# Altium PCB NB2DSK01.PcbDoc (part 7 of 17)
Units mil, origin at the board's own origin, x right, y up, seen from the top; angles counter-clockwise.
Board outline 11815 x 6500.03 mil, 8 copper layers (Top Layer, MidLayer1, MidLayer2, GND, PWR, MidLayer3, MidLayer4, Bottom Layer), stack 74.62 mil thick; 798 components, 1002 nets, 3927 pads, 3182 vias.
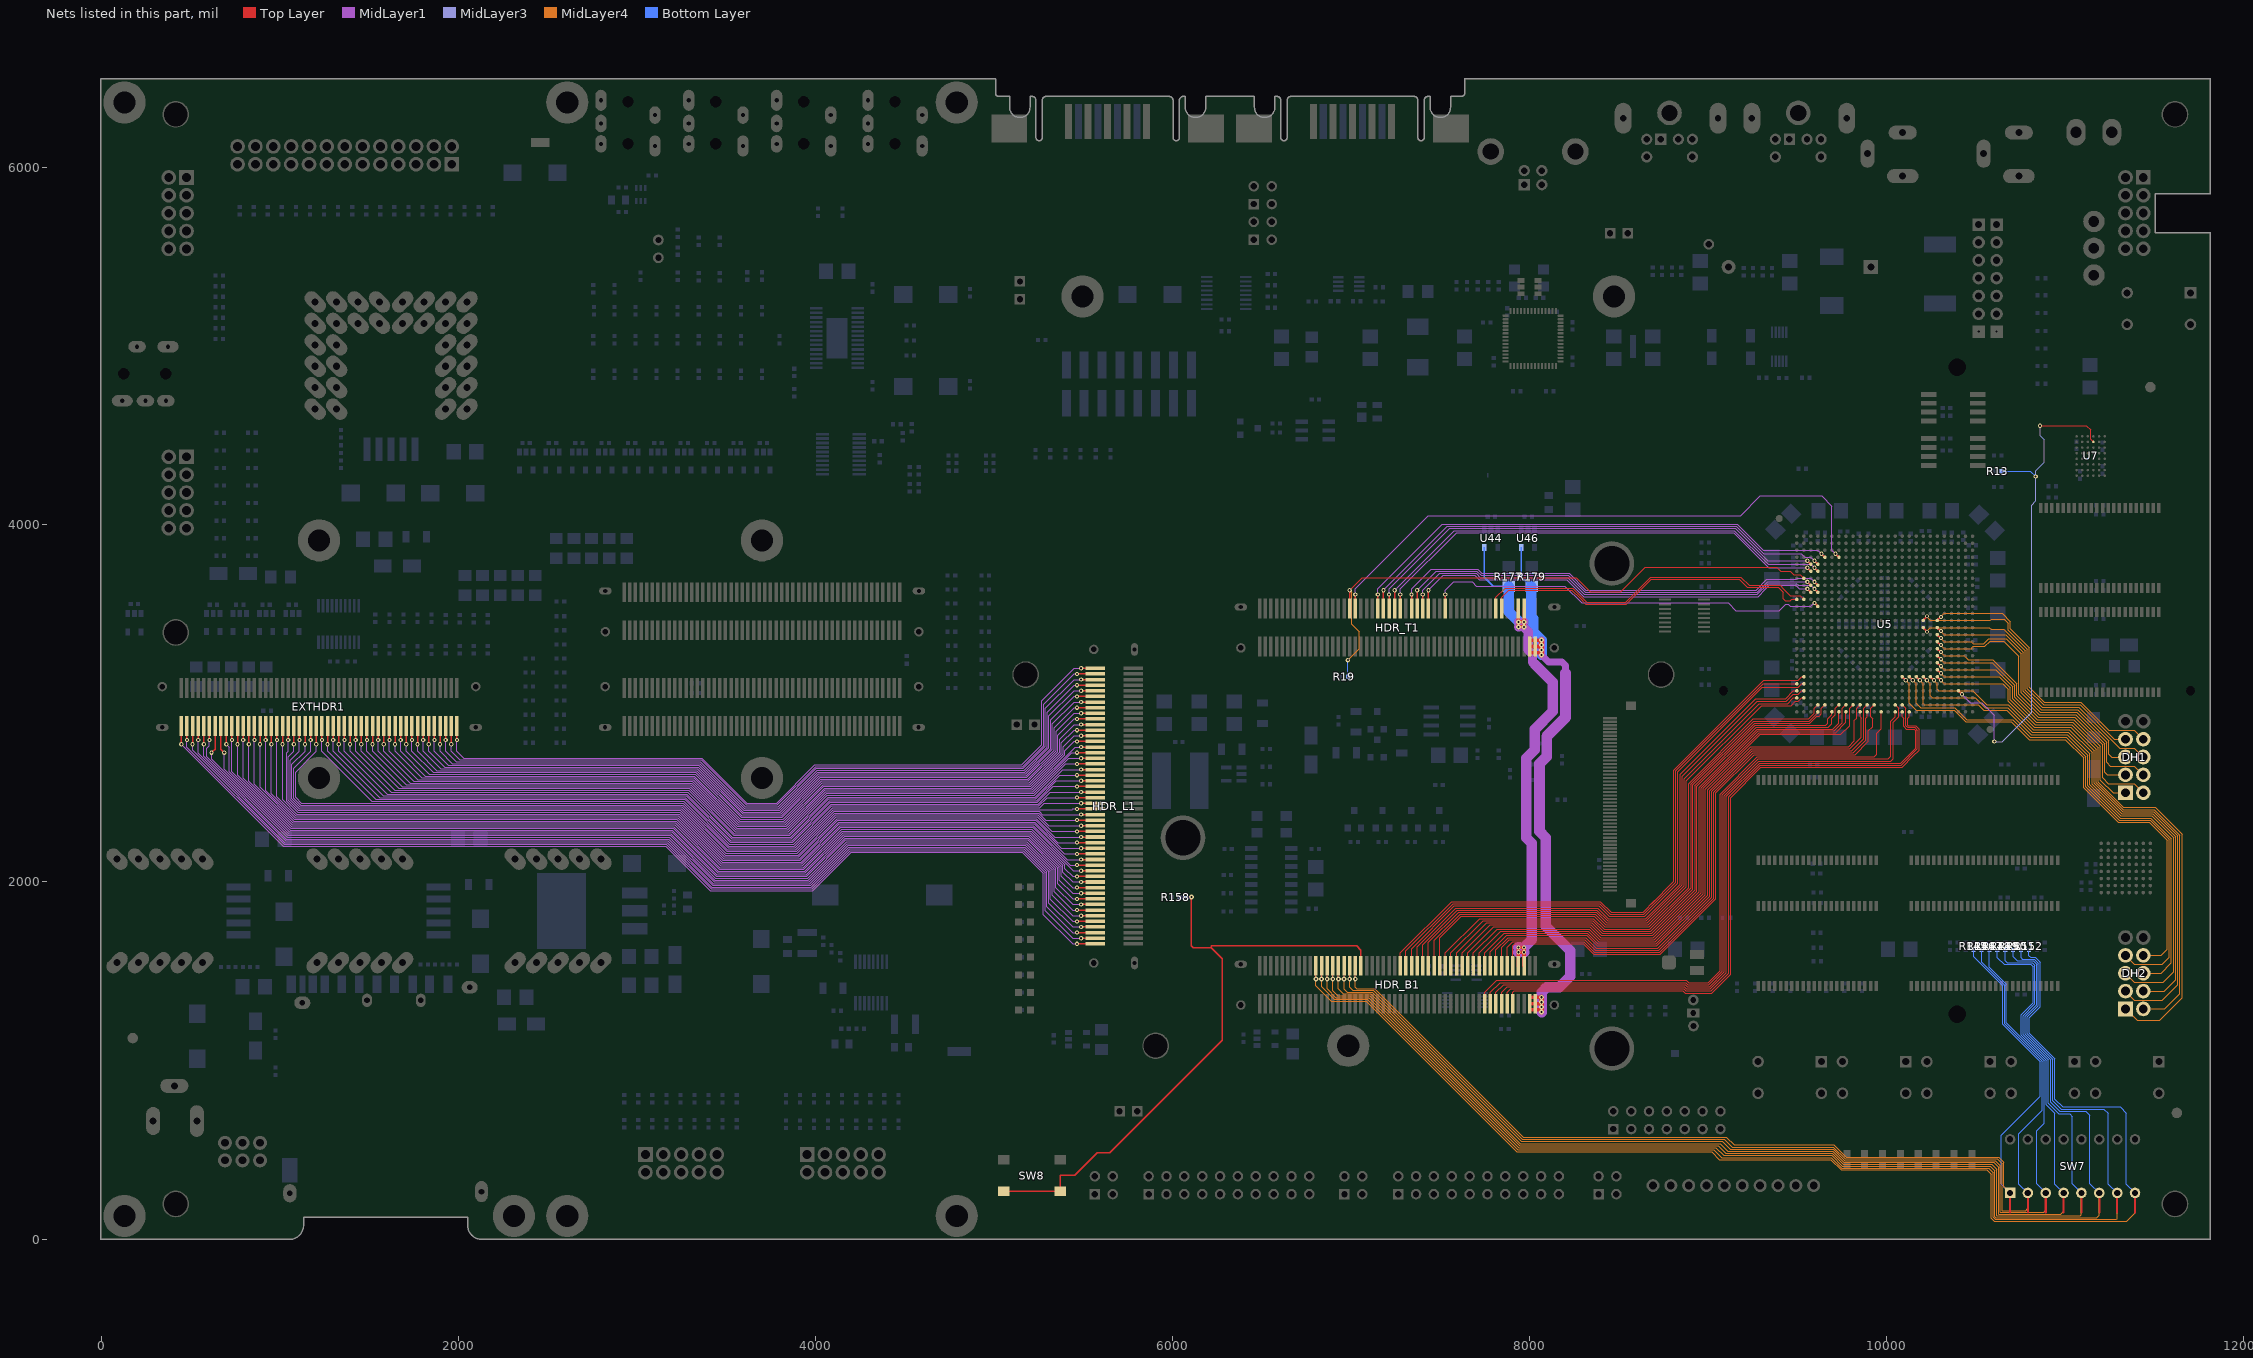
[diagram p13: the nets of this part, all layers, seen from the top]

## Via types
v1: diameter 23.62, hole 11.81, Top Layer to Bottom Layer, tented both sides, 1950 vias
v2: diameter 27.56, hole 11.81, Top Layer to Bottom Layer, tented both sides, 679 vias
v3: diameter 23.62, hole 11.81, Top Layer to Bottom Layer, 194 vias
v4: diameter 31.5, hole 11.81, Top Layer to Bottom Layer, tented both sides, 178 vias
v5: diameter 21.65, hole 11.81, Top Layer to Bottom Layer, tented both sides, 67 vias
v6: diameter 23.62, hole 11.81, Top Layer to Bottom Layer, tented bottom, 53 vias
v7: diameter 26, hole 11.81, Top Layer to Bottom Layer, tented both sides, 21 vias
v8: diameter 26, hole 11.81, Top Layer to Bottom Layer, 13 vias
v9: diameter 28, hole 11.81, Top Layer to Bottom Layer, 8 vias
v10: diameter 25.59, hole 11.81, Top Layer to Bottom Layer, tented both sides, 7 vias
v11: diameter 39.37, hole 11.81, Top Layer to Bottom Layer, tented both sides, 5 vias
v12: diameter 30, hole 11.81, Top Layer to Bottom Layer, 3 vias
v13: diameter 30, hole 11.81, Top Layer to Bottom Layer, tented both sides, 2 vias
v14: diameter 23, hole 11.81, Top Layer to Bottom Layer, tented both sides, 1 vias
v15: diameter 26.56, hole 11.81, Top Layer to Bottom Layer, tented both sides, 1 vias

## Nets (pads, with @x,y where several pads share a name; then routed paths per layer and width w, separated by ;. In a path a pad name is that pad's centre, name@x,y a point inside that pad or via, vN(x,y) a via of type N, cw(c..) or ccw(c..) an arc to the next point about the centre after c; other vN are vias at no path point) (continued)
DAU_PROG.ID3: HDR_T1.36 U5.D7 | length 3320.7
  Top Layer w7.87: HDR_T1.36@7023.62,3531.5 v1(7023.62,3610.24) ; v1(9712.6,3838.58) U5.D7@9732.28,3818.9
  MidLayer1 w5: v1(7023.62,3610.24) 7023.62,3641.73 7433.07,4051.18 9181.1,4051.18 9291.92,4162 9635.28,4162 9692.91,4104.37 9692.91,3858.27 v1(9712.6,3838.58)
DAU_PROG.INIT: HDR_T1.68 U5.L4 | length 2310.6
  Top Layer w7.87: HDR_T1.68@7527.56,3531.5 v1(7527.56,3610.24) ; v1(9594.49,3562.99) U5.L4@9614.17,3543.31
  MidLayer1 w5: v1(7527.56,3610.24) 7527.56,3633.86 7574.8,3681.1 7677.17,3681.1 7700.79,3657.48 8196.85,3657.48 8291.34,3562.99 9111.5,3562.99 9154.04,3520.45 9398.41,3520.45 9433.07,3555.12 9448.82,3555.12 9460.63,3543.31 9574.8,3543.31 v1(9594.49,3562.99)
DAU_PROG.INSTALLED: HDR_T1.34 R19.1 U5.G2 | length 3322.5
  Top Layer w5: v1(6992.13,3633.86) 7062.99,3704.73 8259.84,3704.73 8338.58,3625.99 8510.21,3625.99 8646.24,3762.01 9384.19,3762.01 9406.05,3740.16 9413.39,3740.16 9433.07,3740.16 9460.63,3740.16 9480.31,3720.47 9515.75,3720.47 U5.G2@9535.43,3700.79
  Top Layer w7.87: HDR_T1.34@6992.13,3531.5 v1(6992.13,3633.86)
  MidLayer4 w5: v1(6981.8,3242.47) 7046,3306.67 7046,3402.6 7004,3444.6 7004,3621.99 v1(6992.13,3633.86)
  Bottom Layer w5: R19.1@6981.8,3149.6 v1(6981.8,3242.47)
DAU_PROG.M0: HDR_T1.60 U5.J4 | length 2448.6
  Top Layer w7.87: HDR_T1.60@7401.58,3531.5 v1(7401.58,3610.24) ; v1(9594.49,3641.73) U5.J4@9614.17,3622.05
  MidLayer1 w5: v1(7401.58,3610.24) 7401.58,3633.86 7496.06,3728.35 7700.79,3728.35 7724.41,3704.73 8212.6,3704.73 8307.09,3610.24 9275.59,3610.24 9336.46,3671.1 9494.31,3671.1 9504,3661.42 9574.8,3661.42 v1(9594.49,3641.73)
DAU_PROG.M1: HDR_T1.58 U5.H3 | length 2432.7
  Top Layer w7.87: HDR_T1.58@7370.08,3531.5 v1(7370.08,3633.86) ; v1(9555.12,3681.1) U5.H3@9574.8,3661.42
  MidLayer1 w5: v1(7370.08,3633.86) 7476.38,3740.16 7704.72,3740.16 7728.35,3716.54 8216.54,3716.54 8311.02,3622.05 9273.26,3622.05 9332.31,3681.1 9413.39,3681.1 9433.07,3681.1 v1(9555.12,3681.1)
DAU_PROG.M2: HDR_T1.56 U5.H4 | length 2524.4
  Top Layer w7.87: HDR_T1.56@7338.58,3531.5 v1(7338.58,3610.24) ; v1(9594.49,3681.1) U5.H4@9614.17,3661.42
  MidLayer1 w5: v1(7338.58,3610.24) 7338.58,3641.73 7448.82,3751.97 7708.66,3751.97 7732.28,3728.35 8220.47,3728.35 8314.96,3633.86 9267.72,3633.86 9328.31,3694.45 9493.57,3694.45 9499.9,3700.79 9574.8,3700.79 v1(9594.49,3681.1)
DAU_PROG.PROG_CLK: HDR_T1.88 U5.K1 | length 1898.5
  Top Layer w5: HDR_T1.88@7842.52,3531.5 7842.52,3594.49 7881.89,3633.86 8236.22,3633.86 8279.53,3590.55 8314.96,3555.12 8541.35,3555.12 8681.39,3695.16 9174.92,3695.16 9219.29,3650.79 9393.63,3650.79 9421.21,3623.2 9421.21,3585.79 9432.2,3574.8 9460.63,3574.8 9468.5,3582.68 U5.K1@9496.06,3582.68
DAU_PROG.PROG_PWR_ON: HDR_T1.86 U5.K2 | length 1950.3
  Top Layer w5: HDR_T1.86@7811.02,3531.5 7811.02,3594.49 7862.21,3645.67 8240.16,3645.67 8318.9,3566.93 8538.16,3566.93 8677.68,3706.45 9183.31,3706.45 9228.98,3660.79 9402.2,3660.79 9419.54,3643.45 9460.63,3602.36 9515.75,3602.36 U5.K2@9535.43,3582.68
DAU_PROG.PROGRAM: HDR_T1.62 U5.J3 | length 2369.4
  Top Layer w7.87: HDR_T1.62@7433.07,3531.5 v1(7433.07,3633.86) ; v1(9555.12,3641.73) U5.J3@9574.8,3622.05
  MidLayer1 w5: v1(7433.07,3633.86) 7515.75,3716.54 7692.91,3716.54 7716.54,3692.91 8208.66,3692.91 8303.15,3598.43 9279.53,3598.43 9322.83,3641.73 9342.2,3661.1 9490.17,3661.1 9509.54,3641.73 v1(9555.12,3641.73)
DAU_RESET_SW: HDR_B1.38 R158.2 SW8.1 SW8.2 | length 3571.4
  Top Layer w7.87: SW8.2@5055.12,267.72 SW8.1@5370.47,267.72 5370.47,358.27 5452.76,358.27 5577.94,483.45 5648.68,483.45 6278.68,1113.45 6278.68,1570.02 6217.27,1631.43 ; v2(6105.79,1915) 6105.79,1642.21 6116.57,1631.43 6217.27,1631.43 ; HDR_B1.38@7055.12,1531.5 7055.12,1618.11 7031.5,1641.73 6217.27,1641.73 6217.27,1631.43
  Bottom Layer w15.75: R158.2@6038,1915 v2(6105.79,1915)
DAU_SPI.CLK: HDR_T1.46 U5.E4 | length 2771.9
  Top Layer w7.87: HDR_T1.46@7181.1,3531.5 v1(7181.1,3633.86) ; v1(9594.49,3799.21) U5.E4@9614.17,3779.53
  MidLayer1 w5: v1(7181.1,3633.86) 7539.37,3992.13 9156.64,3992.13 9280.31,3868.45 9310.18,3838.58 9413.39,3838.58 9433.07,3838.58 9519.69,3838.58 9539.37,3818.9 9574.8,3818.9 v1(9594.49,3799.21)
DAU_SPI.DIN: HDR_T1.50 U5.F4 | length 2705.6
  Top Layer w7.87: HDR_T1.50@7244.09,3531.5 v1(7244.1,3633.86) ; v1(9594.49,3759.84) U5.F4@9614.17,3740.16
  MidLayer1 w5: v1(7244.1,3633.86) 7578.74,3968.5 9146.86,3968.5 9335.83,3779.53 9413.39,3779.53 9433.07,3779.53 9574.8,3779.53 v1(9594.49,3759.84)
DAU_SPI.DOUT: HDR_T1.44 U5.D5 | length 2840.9
  Top Layer w7.87: HDR_T1.44@7149.61,3531.5 v1(7149.61,3610.24) ; v1(9633.86,3838.58) U5.D5@9653.54,3818.9
  MidLayer1 w5: v1(7149.61,3610.24) 7149.61,3641.73 7511.81,4003.94 9161.53,4003.94 9307.2,3858.27 9614.17,3858.27 v1(9633.86,3838.58)
DAU_SPI.MODE: HDR_T1.52 U5.F3 | length 2629.6
  Top Layer w7.87: HDR_T1.52@7275.59,3531.5 v1(7275.59,3610.24) ; v1(9555.12,3759.84) U5.F3@9574.8,3740.16
  MidLayer1 w5: v1(7275.59,3610.24) 7275.59,3641.73 7590.55,3956.69 9141.73,3956.69 9338.58,3759.84 9413.39,3759.84 9433.07,3759.84 v1(9555.12,3759.84)
DAU_SPI.SEL: HDR_T1.48 U5.E3 | length 2695.9
  Top Layer w7.87: HDR_T1.48@7212.6,3531.5 v1(7212.6,3610.24) ; v1(9555.12,3799.21) U5.E3@9574.8,3779.53
  MidLayer1 w5: v1(7212.6,3610.24) 7212.6,3641.73 7551.18,3980.32 9151.75,3980.32 9332.85,3799.21 9409.45,3799.21 9433.07,3799.21 v1(9555.12,3799.21)
DAU_TFT.BLIGHT: HDR_B1.91 U5.AF17 | length 3757.4
  Top Layer w5: HDR_B1.91@7905.51,1318.9 7905.51,1381.89 7913.39,1389.76 8858.27,1389.76 8870.08,1377.95 9019.69,1377.95 9125.98,1484.25 9125.98,2472.44 9295.28,2641.73 10085.73,2641.73 10149.68,2705.68 10181.68,2737.68 10181.68,2855.32 10161,2876 10121.13,2876 10118.11,2879.02 10118.11,2917.32 10125.98,2925.2 U5.AF17@10125.98,2952.76
DAU_TFT.BLUE0: HDR_B1.62 U5.AD1 | length 3161
  Top Layer w5: HDR_B1.62@7433.07,1531.5 7433.07,1661.42 7602.36,1830.71 8372.22,1830.71 8431.28,1771.65 8659.28,1771.65 8866.14,1978.52 8866.14,2578.91 9286.68,2999.45 9444.34,2999.45 9476.38,3031.5 U5.AD1@9496.06,3031.5
DAU_TFT.BLUE1: HDR_B1.64 U5.AD2 | length 3171
  Top Layer w5: HDR_B1.64@7464.57,1531.5 7464.57,1673.23 7610.24,1818.9 8367.33,1818.9 8426.38,1759.84 8664.17,1759.84 8877.95,1973.63 8877.95,2565.72 9300.68,2988.45 9464.83,2988.45 9488.19,3011.81 9503.94,3011.81 9523.62,3031.5 U5.AD2@9535.43,3031.5
DAU_TFT.BLUE2: HDR_B1.66 U5.AE4 | length 3220.5
  Top Layer w5: HDR_B1.66@7496.06,1531.5 7496.06,1687.06 7616.09,1807.09 8362.44,1807.09 8421.49,1748.03 8669.06,1748.03 8889.76,1968.74 8889.76,2551.18 9251.97,2913.39 9507.87,2913.39 9562.99,2913.39 9594.49,2944.88 9594.49,2972.44 U5.AE4@9614.17,2992.13
DAU_TFT.BLUE3: HDR_B1.68 U5.AF4 | length 3109.8
  Top Layer w5: HDR_B1.68@7527.56,1531.5 7527.56,1602.36 7720.47,1795.28 8357.54,1795.28 8416.6,1736.22 8673.95,1736.22 8901.58,1963.84 8901.57,2547.24 9255.91,2901.58 9566.93,2901.58 9570.87,2905.51 9614.17,2948.82 U5.AF4@9614.17,2952.76
DAU_TFT.BLUE4: HDR_B1.70 U5.AE5 | length 3150.7
  Top Layer w5: HDR_B1.70@7559.06,1531.5 7559.06,1602.36 7740.16,1783.47 8352.65,1783.47 8411.71,1724.41 8678.84,1724.41 8913.39,1958.95 8913.39,2543.31 9259.84,2889.76 9569.26,2889.76 9608.63,2929.13 9622.05,2929.13 9633.86,2940.95 9633.86,2972.44 U5.AE5@9653.54,2992.13
DAU_TFT.CL1: HDR_B1.88 U5.AE11 | length 3207.8
  Top Layer w5: HDR_B1.88@7842.52,1531.5 7842.52,1633.86 7885.83,1677.17 8308.62,1677.17 8367.68,1618.11 8722.88,1618.11 9019.69,1914.92 9019.69,2507.87 9215.38,2703.57 9247.26,2735.45 9802.68,2735.45 9870.08,2802.85 9870.08,2877.95 9870.08,2889.76 9870.08,2972.44 U5.AE11@9889.76,2992.13
DAU_TFT.CL2: HDR_B1.90 U5.AF11 | length 3149.2
  Top Layer w5: HDR_B1.90@7874.02,1531.5 7874.02,1633.86 7905.51,1665.36 8303.73,1665.36 8362.78,1606.3 8727.77,1606.3 9031.5,1910.03 9031.5,2503.94 9252.01,2724.45 9811.68,2724.45 9881.89,2794.66 9881.89,2877.95 9881.89,2889.76 9881.89,2917.32 9889.76,2925.2 U5.AF11@9889.76,2952.76
DAU_TFT.CL3: HDR_B1.92 U5.AE12 | length 3201.3
  Top Layer w5: HDR_B1.92@7905.51,1531.5 7905.51,1641.73 7917.32,1653.54 8298.84,1653.54 8357.89,1594.49 8732.66,1594.49 9043.31,1905.14 9043.31,2500 9256.76,2713.45 9822.68,2713.45 9897.64,2788.41 9897.64,2846.46 9921.26,2870.08 9921.26,2889.76 9921.26,2913.39 9909.45,2925.2 9909.45,2972.44 U5.AE12@9929.13,2992.13
DAU_TFT.DISP_ON: HDR_B1.89 U5.AE16 | length 3819.8
  Top Layer w5: HDR_B1.89@7874.02,1318.9 7874.02,1381.89 7893.7,1401.58 8862.2,1401.58 8874.02,1389.76 9015.75,1389.76 9114.17,1488.19 9114.17,2476.38 9291.34,2653.54 10079.72,2653.54 10171.68,2745.51 10171.68,2851.18 10156.86,2866 10116.14,2866 10106.3,2875.84 10106.3,2972.44 U5.AE16@10086.61,2992.13
DAU_TFT.GREEN0: HDR_B1.72 U5.AF6 | length 3147.4
  Top Layer w5: HDR_B1.72@7590.55,1531.5 7590.55,1602.36 7759.84,1771.65 8347.76,1771.65 8406.81,1712.6 8683.74,1712.6 8925.2,1954.06 8925.2,2539.37 9263.78,2877.95 9657.48,2877.95 9669.29,2889.76 9669.29,2913.39 9692.91,2937.01 U5.AF6@9692.91,2952.76
DAU_TFT.GREEN1: HDR_B1.74 U5.AE7 | length 3188.3
  Top Layer w5: HDR_B1.74@7622.05,1531.5 7622.05,1602.36 7779.53,1759.84 8342.87,1759.84 8401.92,1700.79 8688.63,1700.79 8937.01,1949.17 8937.01,2535.43 9267.72,2866.14 9673.23,2866.14 9692.91,2885.83 9692.91,2897.64 9692.91,2917.32 9712.6,2937.01 9712.6,2972.44 U5.AE7@9732.28,2992.13
DAU_TFT.GREEN2: HDR_B1.76 U5.AF7 | length 3138.8
  Top Layer w5: HDR_B1.76@7653.54,1531.5 7653.54,1602.36 7799.21,1748.03 8337.98,1748.03 8397.03,1688.98 8693.52,1688.98 8948.82,1944.28 8948.82,2531.5 9262.78,2845.45 9273.46,2856.14 9698.66,2856.14 9732.28,2889.76 U5.AF7@9732.28,2952.76
DAU_TFT.GREEN3: HDR_B1.78 U5.AE8 | length 3173.9
  Top Layer w5: HDR_B1.78@7685.04,1531.5 7685.04,1602.36 7818.9,1736.22 8333.08,1736.22 8392.14,1677.17 8698.41,1677.17 8960.63,1939.38 8960.63,2527.56 9279.21,2846.14 9706.37,2846.14 9751.97,2891.74 9751.97,2972.44 U5.AE8@9771.65,2992.13
DAU_TFT.GREEN4: HDR_B1.80 U5.AF8 | length 3113.5
  Top Layer w5: HDR_B1.80@7716.54,1531.5 7716.53,1602.36 7838.58,1724.41 8328.19,1724.41 8387.25,1665.36 8703.31,1665.36 8972.44,1934.49 8972.44,2523.62 9268.27,2819.45 9284.96,2836.14 9713.37,2836.14 9771.65,2894.43 U5.AF8@9771.65,2952.76
DAU_TFT.GREEN5: HDR_B1.82 U5.AE9 | length 3161.8
  Top Layer w5: HDR_B1.82@7748.03,1531.5 7748.03,1602.36 7858.27,1712.6 8323.3,1712.6 8382.35,1653.54 8708.2,1653.54 8984.25,1929.6 8984.25,2519.69 9290.71,2826.14 9743.46,2826.14 9791.34,2874.02 9791.34,2889.76 9791.34,2972.44 U5.AE9@9811.02,2992.13
DAU_TFT.IRQ: HDR_B1.81 U5.AF13 | length 3647.3
  Top Layer w5: HDR_B1.81@7748.03,1318.9 7748.03,1381.89 7814.96,1448.82 8877.95,1448.82 8889.76,1437.01 9000,1437.01 9066.93,1503.94 9066.93,2492.13 9275.59,2700.79 9929.13,2700.79 9944.88,2716.54 9944.88,2834.22 9968.5,2857.84 9968.5,2870.08 9968.5,2889.76 U5.AF13@9968.5,2952.76
DAU_TFT.M: HDR_B1.87 U5.AF16 | length 3796.5
  Top Layer w5: HDR_B1.87@7842.52,1318.9 7842.52,1381.89 7874.02,1413.39 8866.14,1413.39 8877.95,1401.58 9011.81,1401.58 9102.36,1492.13 9102.36,2480.32 9287.4,2665.36 10077.39,2665.36 10161.68,2749.65 10161.68,2847.03 10152.72,2856 10110.13,2856 10094.49,2871.65 10094.49,2917.32 10086.61,2925.2 U5.AF16@10086.61,2952.76
DAU_TFT.MUX: HDR_B1.85 U5.AE15 | length 3741.8
  Top Layer w5: HDR_B1.85@7811.02,1318.9 7811.02,1381.89 7854.33,1425.2 8870.08,1425.2 8881.89,1413.39 9007.87,1413.39 9090.55,1496.06 9090.55,2484.25 9283.46,2677.17 10023.62,2677.17 10035.55,2689.09 10035.55,2893.82 10066.93,2925.2 10066.93,2972.44 U5.AE15@10047.24,2992.13
DAU_TFT.POL: HDR_B1.83 U5.AF15 | length 3701.5
  Top Layer w5: HDR_B1.83@7779.53,1318.9 7779.53,1381.89 7834.65,1437.01 8874.02,1437.01 8885.83,1425.2 9003.94,1425.2 9078.74,1500 9078.74,2488.19 9279.53,2688.98 10007.87,2688.98 10023.68,2704.78 10023.68,2901.64 10047.24,2925.2 U5.AF15@10047.24,2952.76
DAU_TFT.RED0: HDR_B1.52 U5.AA2 | length 3410.4
  Top Layer w5: HDR_B1.52@7275.59,1531.5 7275.59,1602.36 7562.99,1889.76 8396.68,1889.76 8455.74,1830.71 8634.81,1830.71 8701.27,1897.16 ; 8683.62,1879.51 8807.09,2002.98 8807.09,2625.98 9311.02,3129.92 9413.39,3129.92 9433.07,3129.92 9503.94,3129.92 9523.62,3149.61 U5.AA2@9535.43,3149.61
DAU_TFT.RED1: HDR_B1.54 U5.AB1 | length 3305.8
  Top Layer w5: HDR_B1.54@7307.09,1531.5 7307.09,1614.17 7570.87,1877.95 8391.79,1877.95 8450.85,1818.9 8639.71,1818.9 8818.9,1998.09 8818.9,2622.05 9307.09,3110.24 9413.39,3110.24 9433.07,3110.24 U5.AB1@9496.06,3110.24
DAU_TFT.RED2: HDR_B1.56 U5.AB2 | length 3346.1
  Top Layer w5: HDR_B1.56@7338.58,1531.5 7338.58,1625.98 7578.74,1866.14 8386.9,1866.14 8445.95,1807.09 8644.6,1807.09 8717.97,1880.46 ; 8700.32,1862.81 8830.71,1993.2 8830.71,2618.11 9303.15,3090.55 9413.39,3090.55 9433.07,3090.55 9503.94,3090.55 9523.62,3110.24 U5.AB2@9535.43,3110.24
DAU_TFT.RED3: HDR_B1.58 U5.AC1 | length 3235.6
  Top Layer w5: HDR_B1.58@7370.08,1531.5 7370.08,1637.8 7586.61,1854.33 8382.01,1854.33 8441.06,1795.28 8649.49,1795.28 8842.52,1988.31 8842.52,2604.29 9265.79,3027.56 9413.39,3027.56 9433.07,3027.56 9476.38,3070.87 U5.AC1@9496.06,3070.87
DAU_TFT.RED4: HDR_B1.60 U5.AC2 | length 3246.2
  Top Layer w5: HDR_B1.60@7401.58,1531.5 7401.57,1649.61 7594.49,1842.52 8377.11,1842.52 8436.17,1783.47 8654.38,1783.47 8854.33,1983.41 8854.33,2592.1 9273.68,3011.45 9436.65,3011.45 9476.38,3051.18 9503.94,3051.18 9523.62,3070.87 U5.AC2@9535.43,3070.87
DAU_TFT.STH: HDR_B1.86 U5.AF10 | length 3169
  Top Layer w5: HDR_B1.86@7811.02,1531.5 7811.02,1619.72 7880.28,1688.98 8313.51,1688.98 8372.57,1629.92 8717.98,1629.92 9007.87,1919.81 9007.87,2511.81 9242.52,2746.45 9792.68,2746.45 9858.27,2812.04 9858.27,2877.95 9858.27,2889.76 9858.27,2917.32 9850.39,2925.2 U5.AF10@9850.39,2952.76
DAU_TFT.STV: HDR_B1.84 U5.AE10 | length 3215.6
  Top Layer w5: HDR_B1.84@7779.53,1531.5 7779.53,1608.3 7872.02,1700.79 8318.41,1700.79 8377.46,1641.73 8713.09,1641.73 8996.06,1924.71 8996.06,2515.75 9238.77,2758.45 9786.68,2758.45 9818.9,2790.67 9818.9,2877.95 9818.9,2889.76 9818.9,2905.51 9830.71,2917.32 9830.71,2972.44 U5.AE10@9850.39,2992.13
DBPOWER.3V3: HDR_B1.94 HDR_B1.96 HDR_T1.94 HDR_T1.96 R177.2 U44.5 | length 3225.7
  Top Layer w19.68: HDR_B1.94@7937.01,1531.5 v1(7937.01,1606.3) v1(7937.01,1633.86) ; v2(7968.5,3429.13) v2(7968.5,3456.69) HDR_T1.96@7968.5,3531.5
  Top Layer w20: v1(7937.01,1606.3) v1(7968.5,1606.3) ; v1(7937.01,1633.86) v1(7968.5,1633.86) v1(7968.5,1606.3) ; HDR_T1.94@7937.01,3531.5 v2(7937.01,3456.69) ; HDR_B1.96@7968.5,1531.5 v1(7968.5,1606.3) ; v2(7968.5,3429.13) v2(7937.01,3429.13) v2(7937.01,3456.69) ; v2(7968.5,3456.69) v2(7937.01,3456.69)
  MidLayer1 w51.18: v2(7937.01,3429.13) 7940.95,3429.13 7952.76,3440.94 ; v2(7937.01,3456.69) 7950.79,3442.91 7952.76,3440.94 ; v2(7968.5,3456.69) 7954.73,3442.91 7952.76,3440.94 ; 8031.5,3216.54 8015.75,3232.28 8015.75,3275.59 7992.13,3299.21 7992.13,3401.58 7966.54,3427.17 7952.76,3440.94
  MidLayer1 w59.06: v1(7937.01,1606.3) 7940.94,1606.3 7952.76,1618.11 7954.72,1620.08 ; v1(7937.01,1633.86) 7940.94,1633.86 7952.76,1622.05 7954.72,1620.08 ; v1(7968.5,1606.3) 7954.72,1620.08 ; 8031.5,3216.54 8129.92,3118.11 8129.92,2956.69 8027.56,2854.33 8027.56,2740.16 7980.32,2692.91 7980.32,2248.03 8011.81,2216.54 8011.81,1677.17 v1(7968.5,1633.86) 7954.72,1620.08
  Bottom Layer w7.87: U44.5@7746.06,3874.38 7746.06,3706.69 7797.24,3655.51 R177.2@7883.86,3655.51
  Bottom Layer w59.06: R177.2@7883.86,3655.51 7883.86,3513.78 7938.98,3458.66 7952.76,3444.88
DBPOWER.5V0: HDR_B1.97 HDR_B1.99 HDR_T1.97 HDR_T1.99 R179.2 U46.5 | length 3643.3
  Top Layer w19.68: HDR_B1.97@8000,1283.46 8031.5,1283.46 v2@8066.93,1283.46 ; HDR_B1.97@8000,1318.9 HDR_B1.99@8031.5,1318.9 v2@8066.93,1318.9 ; HDR_T1.97@8000,3283.46 8031.5,3283.46 v2@8066.93,3283.46 ; HDR_T1.97@8000,3318.9 HDR_T1.99@8031.5,3318.9 v2@8066.93,3318.9
  Top Layer w20: HDR_B1.97@8000,1354.33 8031.5,1354.33 v2(8066.93,1354.33) ; HDR_T1.97@8000,3354.33 8031.5,3354.33 v2(8066.93,3354.33)
  Top Layer w29.53: v2(8066.93,1271.65) 8066.93,1283.46 v2(8066.93,1299.21) 8066.93,1318.9 v2(8066.93,1326.77) v2(8066.93,1354.33) ; v2(8066.93,3271.65) 8066.93,3283.46 v2(8066.93,3299.21) 8066.93,3318.9 v2(8066.93,3326.77) v2(8066.93,3354.33)
  MidLayer1 w39.37: v2(8066.93,3354.33) v2(8066.93,3326.77) v2(8066.93,3299.21) v2(8066.93,3271.65) 8106.3,3232.28 8181.1,3232.28 8200.79,3212.6 8200.79,3169.29
  MidLayer1 w59.06: v2(8066.93,1271.65) v2(8066.93,1299.21) v2(8066.93,1326.77) v2(8066.93,1354.33) 8066.93,1381.89 8094.49,1409.45 8165.35,1409.45 8228.35,1472.44 8228.35,1614.17 8090.55,1751.97 8090.55,2248.03 8055.12,2283.46 8055.12,2661.42 8094.49,2700.79 8094.49,2814.96 8200.79,2921.26 8200.79,3169.29
  Bottom Layer w7.87: U46.5@7952.76,3874.38 7952.76,3708.66 R179.2@8007.87,3653.54
  Bottom Layer w59.06: R179.2@8007.87,3657.48 8007.87,3655.51 8007.87,3653.54 8007.87,3485.98 8019.68,3474.17 8019.68,3401.57 v2(8066.93,3354.33) v2(8066.93,3326.77) v2(8066.93,3299.21) v2(8066.93,3271.65)
DEBA.D0: DH1.1 U5.V21 | length 1521.4
  Top Layer w7.87: U5.V21@10283.46,3267.72 v1(10303.15,3248.03)
  MidLayer4 w5: v1(10303.15,3248.03) 10322.84,3228.35 10543.31,3228.35 10562.99,3228.35 10590.55,3228.35 10716.54,3102.36 10716.54,3035.43 10842.52,2909.45 11047.24,2909.45 11196.85,2759.84 11196.85,2570.87 11267.72,2500 DH1.1@11337.01,2500
DEBA.D1: DH1.2 U5.U21 | length 1635.4
  Top Layer w7.87: U5.U21@10283.46,3307.09 v1(10303.15,3287.4)
  MidLayer4 w5: v1(10303.15,3287.4) 10322.84,3267.72 10433.07,3267.72 10456.69,3244.1 10543.31,3244.1 10562.99,3244.1 10594.49,3244.1 10728.35,3110.24 10728.35,3043.31 10848.29,2923.37 11053.01,2923.37 11208.66,2767.72 11208.66,2582.68 11240.16,2551.18 11385.83,2551.18 DH1.2@11437.01,2500
DEBA.D2: DH1.3 U5.T21 | length 1617.5
  Top Layer w7.87: U5.T21@10283.46,3346.46 v1(10303.15,3326.77)
  MidLayer4 w5: v1(10303.15,3326.77) 10322.84,3307.09 10472.44,3307.09 10484.25,3318.9 10550.13,3318.9 10580.68,3349.45 10655.68,3349.45 10739.76,3265.37 10739.76,3235.53 ; 10740.16,3235.53 10740.16,3051.18 10854.05,2937.29 11058.78,2937.29 11220.47,2775.59 11220.47,2614.17 11234.65,2600 DH1.3@11337.01,2600
DEBA.D3: DH1.4 U5.R21 | length 1698.1
  Top Layer w7.87: U5.R21@10283.46,3385.83 v1(10303.15,3366.14)
  MidLayer4 w5: v1(10303.15,3366.14) 10322.84,3346.46 10472.44,3346.46 10484.25,3334.65 10543.31,3334.65 10571.12,3362.45 10669.04,3362.45 10751.97,3279.53 10751.97,3059.06 10859.82,2951.21 11064.54,2951.21 11232.28,2783.47 11232.28,2669.29 11251.97,2649.61 11387.4,2649.61 DH1.4@11437.01,2600
DEBA.D4: DH1.5 U5.P21 | length 1526.9
  Top Layer w7.87: U5.P21@10283.46,3425.2 v1(10303.15,3405.51)
  MidLayer4 w5: v1(10303.15,3405.51) 10322.84,3385.83 10543.31,3385.83 10562.99,3385.83 10665.35,3385.83 10763.78,3287.4 10763.78,3066.93 10865.58,2965.13 11070.31,2965.13 11244.09,2791.34 11244.09,2716.54 11260.63,2700 DH1.5@11337.01,2700
DEBA.D5: DH1.6 U5.P19 | length 1678.1
  Top Layer w7.87: U5.P19@10204.72,3425.2 v5@10224.41,3405.51
  MidLayer4 w5: v5@10224.41,3405.51 10244.09,3425.2 10543.31,3425.2 10562.99,3425.2 10574.8,3425.2 10584.55,3415.45 10655.41,3415.45 10775.59,3295.28 10775.59,3074.8 10871.35,2979.05 11076.07,2979.05 11305.12,2750 11387.01,2750 DH1.6@11437.01,2700
  other v5: 10224.41,3401.58
DEBA.D6: DH1.7 U5.N19 | length 1582.6
  Top Layer w7.87: U5.N19@10204.72,3464.57 v5@10224.41,3484.25
  MidLayer4 w5: v5@10224.41,3484.25 10244.09,3464.57 10543.31,3464.57 10562.99,3464.57 10578.74,3464.57 10586.61,3472.44 10657.48,3472.44 10681.1,3448.82 10681.1,3409.45 10787.4,3303.15 10787.4,3082.68 10877.95,2992.13 11082.68,2992.13 11274.8,2800 DH1.7@11337.01,2800
  other v5: 10224.41,3488.19
DEBA.D7: DH1.8 U5.N21 | length 1613.6
  Top Layer w7.87: U5.N21@10283.46,3464.57 v1(10303.15,3484.25)
  MidLayer4 w5: v1(10303.15,3484.25) 10322.84,3503.94 10543.31,3503.94 10562.99,3503.94 10645.67,3503.94 10692.91,3456.69 10692.91,3417.32 10799.21,3311.02 10799.21,3090.55 10881.89,3007.87 11086.61,3007.87 11244.09,2850.39 11386.62,2850.39 DH1.8@11437.01,2800
DEBB.D0: DH2.1 U5.W21 | length 3233.7
  Top Layer w7.87: U5.W21@10283.46,3228.35 v1(10303.15,3208.66)
  MidLayer4 w5: v1(10303.15,3208.66) 10322.84,3188.98 10543.31,3188.98 10562.98,3188.98 10610.25,3188.97 10704.72,3094.49 10704.72,3027.56 10837.74,2894.54 11042.47,2894.54 11185.04,2751.97 11185.04,2557.87 11325.59,2417.32 11503.94,2417.32 11653.54,2267.72 11653.54,1350.39 11527.56,1224.41 11401.58,1224.41 DH2.1@11337.01,1288.98
DEBB.D1: DH2.2 U5.Y21 | length 3020.3
  Top Layer w7.87: U5.Y21@10283.46,3188.98 v1(10303.15,3169.29)
  MidLayer4 w5: v1(10303.15,3169.29) 10322.84,3149.61 10543.31,3149.61 10562.99,3149.61 10629.92,3149.61 10692.92,3086.61 10692.92,3019.68 10831.98,2880.62 11036.7,2880.62 11173.23,2744.1 11173.23,2555.54 11323.26,2405.51 11499.04,2405.51 11641.73,2262.83 11641.73,1374.02 11556.69,1288.98 DH2.2@11437.01,1288.98
DEBB.D2: DH2.3 U5.AA21 | length 3044.6
  Top Layer w7.87: U5.AA21@10283.46,3149.61 v1(10303.15,3129.92)
  MidLayer4 w5: v1(10303.15,3129.92) 10322.84,3110.23 10543.31,3110.24 10562.99,3110.24 10649.61,3110.24 10681.1,3078.74 10681.1,3011.81 10826.21,2866.7 11030.94,2866.7 11161.42,2736.22 11161.42,2553.21 11320.92,2393.7 11494.15,2393.7 11629.92,2257.93 11629.92,1425.2 11543.31,1338.58 11387.4,1338.58 DH2.3@11337.01,1388.98
DEBB.D3: DH2.4 U5.AA20 | length 2875.9
  Top Layer w7.87: U5.AA20@10244.09,3149.61 v1(10263.78,3129.92)
  MidLayer4 w5: v1(10263.78,3129.92) 10283.47,3110.23 10283.47,3078.74 10291.34,3070.87 10480.32,3070.87 10559.06,2992.13 10562.99,2992.13 10578.74,2992.13 10681.1,2992.13 10820.45,2852.78 11023.14,2852.78 11149.61,2726.32 11149.61,2548.32 11316.03,2381.89 11489.26,2381.89 11618.11,2253.04 11618.11,1452.76 11554.33,1388.98 DH2.4@11437.01,1388.98
DEBB.D4: DH2.5 U5.AA19 | length 2981.8
  Top Layer w7.87: U5.AA19@10204.72,3149.61 v1(10224.41,3129.92)
  MidLayer4 w5: v1(10224.41,3129.92) 10244.1,3110.23 10244.1,3043.31 10255.91,3031.5 10496.06,3031.5 10551.18,2976.38 10562.99,2976.38 10578.74,2976.38 10677.17,2976.38 10814.68,2838.86 11016.31,2838.86 11137.8,2717.38 11137.8,2543.42 11311.14,2370.08 11484.37,2370.08 11606.3,2248.15 11606.3,1496.06 11549.24,1439 11386.99,1439 DH2.5@11337.01,1488.98
DEBB.D5: DH2.6 U5.AA18 | length 2849.2
  Top Layer w7.87: U5.AA18@10165.35,3149.61 v1(10185.04,3129.92)
  MidLayer4 w5: v1(10185.04,3129.92) 10204.73,3110.23 10204.73,2996.06 10208.66,2992.13 10511.81,2992.13 10543.31,2960.63 10562.99,2960.63 10578.74,2960.63 10673.23,2960.63 10808.92,2824.94 11010.54,2824.94 11125.98,2709.5 11125.98,2538.53 11306.25,2358.27 11479.48,2358.27 11594.49,2243.26 11594.49,1547.24 11536.22,1488.98 DH2.6@11437.01,1488.98
DEBB.D6: DH2.7 U5.AA17 | length 2939.8
  Top Layer w7.87: U5.AA17@10125.98,3149.61 v1(10145.67,3129.92)
  MidLayer4 w5: v1(10145.67,3129.92) 10165.35,3110.24 10165.35,3000 10188.98,2976.38 10381.89,2976.38 10448.82,2909.45 10562.99,2909.45 10578.74,2909.45 10704.72,2909.45 10803.15,2811.02 11005.62,2811.02 11114.17,2702.47 11114.17,2533.64 11301.35,2346.46 11474.58,2346.46 11582.68,2238.36 11582.68,1578.74 11543.31,1539.37 11386.61,1539.37 DH2.7@11337.01,1588.98
DEBB.D7: DH2.8 U5.AA16 | length 2784.4
  Top Layer w7.87: U5.AA16@10086.61,3149.61 v1(10106.3,3129.92)
  MidLayer4 w5: v1(10106.3,3129.92) 10125.98,3110.24 10125.98,3000 10165.35,2960.63 10377.95,2960.63 10440.95,2897.64 10562.99,2897.64 10578.74,2897.64 10696.85,2897.64 10797.91,2796.58 11000.37,2796.58 11102.36,2694.59 11102.36,2528.75 11296.46,2334.65 11469.69,2334.65 11570.87,2233.47 11570.87,1622.05 11537.8,1588.98 DH2.8@11437.01,1588.98
DIPSW.D0: HDR_B1.22 R152.1 SW7.8 | length 7488.6
  Top Layer w5: v8(6803.15,1456.69) HDR_B1.22@6803.15,1531.5
  Top Layer w11.81: 11390.32,148.43 SW7.8@11390.32,258.43
  MidLayer4 w5: v8(6803.15,1456.69) 6803.15,1419.85 6890.16,1332.84 7084.49,1332.84 7929.13,488.19 9019.69,488.19 9062.99,444.88 9687.56,444.88 9744.44,388 10560.74,388 10586,362.74 10586,117 10603,100 11343,100 11390.32,147.32 SW7.8@11390.32,258.43
  Bottom Layer w5: R152.1@10796.32,1618.11 10796.32,1588 10806.32,1578 10830.28,1578 10859,1549.28 10859,1299.94 10799.21,1240.16 10799.21,1151.94 10940.94,1010.21 10940.94,783.46 10984.25,740.16 11307.09,740.16 11342.52,704.72 11342.52,306.22 SW7.8@11390.32,258.43
DIPSW.D1: HDR_B1.24 R151.1 SW7.7 | length 7330.1
  Top Layer w5: v8(6834.65,1456.69) HDR_B1.24@6834.65,1531.5
  Top Layer w11.81: 11290.32,148.43 SW7.7@11290.32,258.43
  MidLayer4 w5: v8(6834.65,1456.69) 6834.65,1413 6904.81,1342.84 7091.19,1342.84 7934.03,500 9031.5,500 9074.8,456.69 9689.89,456.69 9748.58,398 10570.43,398 10596,372.43 10596,121.14 10607.14,110 11285,110 11290.32,115.32 SW7.7@11290.32,258.43
  Bottom Layer w5: R151.1@10752.03,1618.11 10752.03,1574.97 10759,1568 10826.14,1568 10849,1545.14 10849,1305.69 10787.4,1244.09 10787.4,1149.61 10929.13,1007.87 10929.13,775.59 10976.38,728.35 11216.54,728.35 11240.16,704.72 11240.16,308.58 SW7.7@11290.32,258.43
DIPSW.D2: HDR_B1.26 R150.1 SW7.6 | length 7126
  Top Layer w5: v8(6866.14,1456.69) HDR_B1.26@6866.14,1531.5
  Top Layer w11.81: 11190.32,148.43 SW7.6@11190.32,258.43
  MidLayer4 w5: v8(6866.14,1456.69) 6866.14,1401.86 6915.16,1352.84 7097.89,1352.84 7938.92,511.81 9043.31,511.81 9086.61,468.5 9692.22,468.5 9751.28,409.45 10578.66,409.45 10606,382.11 10606,125.28 10611.28,120 11177,120 11190.32,133.32 SW7.6@11190.32,258.43
  Bottom Layer w5: R150.1@10707.73,1618.11 10707.73,1580.27 10730,1558 10820,1558 10839,1539 10839,1311.44 10775.59,1248.03 10775.59,1147.28 10917.32,1005.54 10917.32,767.72 10968.5,716.54 11114.17,716.54 11137.8,692.91 11137.8,310.95 SW7.6@11190.32,258.43
DIPSW.D3: HDR_B1.28 R149.1 SW7.5 | length 6951
  Top Layer w5: v8(6897.64,1456.69) HDR_B1.28@6897.64,1531.5
  Top Layer w11.81: 11090.32,148.43 SW7.5@11090.32,258.43
  MidLayer4 w5: v8(6897.64,1456.69) 6897.64,1391 6925.8,1362.84 7104.6,1362.84 7331.3,1136.13 7943.81,523.62 9055.12,523.62 9098.43,480.32 9694.55,480.32 9755.42,419.45 10588.35,419.45 10616,391.8 10616,130 11083,130 11090.32,137.32 SW7.5@11090.32,258.43
  Bottom Layer w5: R149.1@10663.44,1618.11 10663.44,1559 10674.44,1548 10815.86,1548 10829,1534.86 10829,1317.19 10763.78,1251.97 10763.78,1144.94 10905.51,1003.21 10905.51,759.84 10964.57,700.79 11023.62,700.79 11039.37,685.04 11039.37,309.37 SW7.5@11090.32,258.43
DIPSW.D4: HDR_B1.30 R148.1 SW7.4 | length 6742.5
  Top Layer w5: v8(6929.13,1456.69) HDR_B1.30@6929.13,1531.5
  Top Layer w11.81: 10990.32,148.43 SW7.4@10990.32,258.43
  MidLayer4 w5: v8(6929.13,1456.69) 6929.13,1400.87 6957.16,1372.84 7111.3,1372.84 7948.7,535.43 9066.93,535.43 9110.24,492.13 9696.89,492.13 9759.56,429.45 10598.03,429.45 10626,401.48 10626,140 10974,140 10990.32,156.32 SW7.4@10990.32,258.43
  Bottom Layer w5: R148.1@10619.15,1618.11 10619.15,1576.85 10658,1538 10807.3,1538 10819,1526.3 10819,1322.94 10751.97,1255.91 10751.97,1142.61 10893.7,1000.88 10893.7,751.97 10940.94,704.72 10940.94,307.8 SW7.4@10990.32,258.43
DIPSW.D5: HDR_B1.32 R147.1 SW7.3 | length 6469.3
  Top Layer w5: v8(6960.63,1456.69) HDR_B1.32@6960.63,1531.5
  Top Layer w11.81: 10890.32,148.43 SW7.3@10890.32,258.43
  MidLayer4 w5: v8(6960.63,1456.69) 6960.63,1400.21 6978,1382.84 7118,1382.84 7953.6,547.24 9078.74,547.24 9122.05,503.94 9699.22,503.94 9763.7,439.45 10607.72,439.45 10636,411.17 10636,150 10878,150 10890.32,162.32 SW7.3@10890.32,258.43
  Bottom Layer w5: R147.1@10574.86,1618.11 10574.86,1521.52 10669.61,1426.77 10669.61,1210.83 10881.89,998.55 10881.89,649.61 10838.58,606.3 10838.58,310.16 SW7.3@10890.32,258.43
DIPSW.D6: HDR_B1.34 R146.1 SW7.2 | length 6365.9
  Top Layer w5: v8(6992.13,1456.69) HDR_B1.34@6992.13,1531.5
  Top Layer w11.81: 10790.32,148.43 SW7.2@10790.32,258.43
  MidLayer4 w5: v8(6992.13,1456.69) 6992.13,1410.87 7010.16,1392.84 7124.71,1392.84 7958.49,559.06 9090.55,559.06 9133.86,515.75 9701.55,515.75 9767.85,449.45 10617.4,449.45 10646,420.85 10646,160 10778,160 10790.32,172.32 SW7.2@10790.32,258.43
  Bottom Layer w5: R146.1@10530.57,1618.11 10530.57,1551.67 10659.61,1422.63 10659.61,1206.69 10870.08,996.22 10870.08,720.47 10740.16,590.55 10740.16,308.58 SW7.2@10790.32,258.43
DIPSW.D7: HDR_B1.36 R145.1 SW7.1 | length 6078.7
  Top Layer w5: v8(7023.62,1456.69) HDR_B1.36@7023.62,1531.5
  Top Layer w11.81: 10690.32,148.43 SW7.1@10690.32,258.43
  MidLayer4 w5: v8(7023.62,1456.69) 7023.62,1411.36 7032.14,1402.84 7131.41,1402.84 7963.38,570.87 9102.36,570.87 9145.67,527.56 9703.88,527.56 9771.99,459.45 10627.09,459.45 10656,430.54 10656,292.74 SW7.1@10690.32,258.43
  Bottom Layer w5: R145.1@10486.28,1618.11 10486.28,1581.82 10649.61,1418.49 10649.61,1202.55 10858.27,993.89 10858.27,799.21 10641.73,582.68 10641.73,307.01 SW7.1@10690.32,258.43
DONE: R13.2 U5.AC24 U7.B4 | length 2891.8
  Top Layer w5: v1(10858.27,4555.12) 11118.11,4555.12 11141.73,4531.5 11141.73,4480.32 U7.B4@11157.48,4464.57
  Top Layer w7.87: U5.AC24@10401.58,3070.87 v1(10421.26,3051.18)
  MidLayer1 w5: v1(10421.26,3051.18) 10468.5,3003.94 10531.5,3003.94 10602.54,2932.89 v1(10602.54,2786.37)
  MidLayer3 w5: v1(10602.54,2786.37) 10646.24,2786.37 10811.02,2951.15 10811.02,4110.24 10834.65,4133.86 10834.65,4271 10834.65,4303.15 10881.89,4350.39 10881.89,4476.38 10858.27,4500 v1@10858.27,4551.18
  Bottom Layer w5: R13.2@10641.64,4300.43 10804.57,4300.43 v1(10834,4271)
EXT_A.D0: EXTHDR1.2 HDR_L1.1 | length 4295.4
  Top Layer w7.87: v1(1992.13,2795.28) EXTHDR1.2@1992.13,2874.02 ; v1(5488.19,3196.85) HDR_L1.1@5566.93,3196.85
  MidLayer1 w5: v1(1992.13,2795.28) 1992.13,2732.28 2030.79,2693.62 3364.14,2693.62 3616.5,2441.26 3782.48,2441.26 3997.05,2655.83 5155.83,2655.83 5267.64,2767.64 5267.64,3015.67 5448.82,3196.85 v1(5488.19,3196.85)
EXT_A.D1: EXTHDR1.4 HDR_L1.3 | length 4311.9
  Top Layer w7.87: v1(1960.63,2771.65) EXTHDR1.4@1960.63,2874.02 ; v1(5464.57,3165.36) HDR_L1.3@5566.93,3165.36
  MidLayer1 w5: v1(1960.63,2771.65) 1960.63,2732.28 2009.29,2683.62 3360,2683.62 3612.36,2431.26 3786.63,2431.26 4001.19,2645.83 5159.97,2645.83 5277.64,2763.5 5277.64,2994.17 5448.82,3165.35 v1(5464.57,3165.36)
EXT_A.D2: EXTHDR1.6 HDR_L1.5 | length 4328.5
  Top Layer w7.87: v1(1929.14,2795.28) EXTHDR1.6@1929.13,2874.02 ; v1(5488.19,3133.86) HDR_L1.5@5566.93,3133.86
  MidLayer1 w5: v1(1929.14,2795.28) 1929.14,2732.28 1987.8,2673.62 3355.85,2673.62 3608.22,2421.26 3790.77,2421.26 4005.34,2635.83 5164.11,2635.83 5287.64,2759.35 5287.64,2972.68 5448.82,3133.86 v1(5488.19,3133.86)
EXT_A.D3: EXTHDR1.8 HDR_L1.7 | length 4345.1
  Top Layer w7.87: v1(1897.64,2771.65) EXTHDR1.8@1897.64,2874.02 ; v1(5464.57,3102.36) HDR_L1.7@5566.93,3102.36
  MidLayer1 w5: v1(1897.64,2771.65) 1897.64,2732.28 1966.3,2663.62 3351.71,2663.62 3604.07,2411.26 3794.91,2411.26 4009.48,2625.83 5168.25,2625.83 5297.64,2755.21 5297.64,2951.18 5448.82,3102.36 v1(5464.57,3102.36)
EXT_A.D4: EXTHDR1.10 HDR_L1.9 | length 4361.6
  Top Layer w7.87: v1(1866.14,2795.28) EXTHDR1.10@1866.14,2874.02 ; v1(5488.19,3070.87) HDR_L1.9@5566.93,3070.87
  MidLayer1 w5: v1(1866.14,2795.28) 1866.14,2732.28 1944.81,2653.62 3347.57,2653.62 3599.93,2401.26 3799.05,2401.26 4013.62,2615.83 5172.4,2615.83 5307.64,2751.07 5307.64,2929.69 5448.82,3070.87 v1(5488.19,3070.87)
EXT_A.D5: EXTHDR1.12 HDR_L1.11 | length 4378.2
  Top Layer w7.87: v1(1834.65,2771.65) EXTHDR1.12@1834.65,2874.02 ; v1(5464.57,3039.37) HDR_L1.11@5566.93,3039.37
  MidLayer1 w5: v1(1834.65,2771.65) 1834.65,2732.28 1923.31,2643.62 3343.43,2643.62 3595.79,2391.26 3803.2,2391.26 4017.76,2605.83 5176.54,2605.83 5317.64,2746.93 5317.64,2908.19 5448.82,3039.37 v1(5464.57,3039.37)
EXT_A.D6: EXTHDR1.14 HDR_L1.13 | length 4394.8
  Top Layer w7.87: v1(1803.15,2795.28) EXTHDR1.14@1803.15,2874.02 ; v1(5488.19,3007.88) HDR_L1.13@5566.93,3007.88
  MidLayer1 w5: v1(1803.15,2795.28) 1803.15,2732.28 1901.81,2633.62 3339.29,2633.62 3591.65,2381.26 3807.34,2381.26 4021.9,2595.83 5180.68,2595.83 5327.64,2742.79 5327.64,2886.7 5448.82,3007.88 v1(5488.19,3007.88)
EXT_A.D7: EXTHDR1.16 HDR_L1.15 | length 4411.3
  Top Layer w7.87: v1(1771.66,2771.65) EXTHDR1.16@1771.65,2874.02 ; v1(5464.57,2976.38) HDR_L1.15@5566.93,2976.38
  MidLayer1 w5: v1(1771.66,2771.65) 1771.66,2732.28 1880.32,2623.62 3335.14,2623.62 3587.51,2371.26 3811.48,2371.26 4026.05,2585.83 5184.82,2585.83 5337.64,2738.64 5337.64,2865.2 5448.82,2976.38 v1(5464.57,2976.38)
EXT_A.D8: EXTHDR1.18 HDR_L1.17 | length 4427.9
  Top Layer w7.87: v1(1740.16,2795.28) EXTHDR1.18@1740.16,2874.02 ; v1(5488.19,2944.88) HDR_L1.17@5566.93,2944.88
  MidLayer1 w5: v1(1740.16,2795.28) 1740.16,2732.28 1858.82,2613.62 3331,2613.62 3583.36,2361.26 3815.62,2361.26 4030.19,2575.83 5188.96,2575.83 5347.64,2734.5 5347.64,2843.7 5448.82,2944.88 v1(5488.19,2944.88)
EXT_A.D9: EXTHDR1.20 HDR_L1.19 | length 4444.5
  Top Layer w7.87: v1(1708.66,2771.65) EXTHDR1.20@1708.66,2874.02 ; v1(5464.57,2913.39) HDR_L1.19@5566.93,2913.39
  MidLayer1 w5: v1(1708.66,2771.65) 1708.66,2732.28 1837.32,2603.62 3326.86,2603.62 3579.22,2351.26 3819.76,2351.26 4034.33,2565.83 5193.11,2565.83 5357.64,2730.36 5357.64,2822.21 5448.82,2913.39 v1(5464.57,2913.39)
EXT_A.D10: EXTHDR1.22 HDR_L1.21 | length 4461
  Top Layer w7.87: v1(1677.17,2795.28) EXTHDR1.22@1677.17,2874.02 ; v1(5488.19,2881.89) HDR_L1.21@5566.93,2881.89
  MidLayer1 w5: v1(1677.17,2795.28) 1677.17,2732.28 1815.83,2593.62 3322.72,2593.62 3575.08,2341.26 3823.91,2341.26 4038.47,2555.83 5197.25,2555.83 5367.64,2726.22 5367.64,2800.71 5448.82,2881.89 v1(5488.19,2881.89)
EXT_A.D11: EXTHDR1.24 HDR_L1.23 | length 4477.6
  Top Layer w7.87: v1(1645.67,2771.65) EXTHDR1.24@1645.67,2874.02 ; v1(5464.57,2850.4) HDR_L1.23@5566.93,2850.39
  MidLayer1 w5: v1(1645.67,2771.65) 1645.67,2732.28 1794.33,2583.62 3318.57,2583.62 3570.94,2331.26 3828.05,2331.26 4042.62,2545.83 5201.39,2545.83 5377.64,2722.08 5377.64,2779.21 5448.82,2850.39 v1(5464.57,2850.4)
EXT_A.D12: EXTHDR1.26 HDR_L1.25 | length 4494.2
  Top Layer w7.87: v1(1614.18,2795.28) EXTHDR1.26@1614.17,2874.02 ; v1(5488.19,2818.9) HDR_L1.25@5566.93,2818.9
  MidLayer1 w5: v1(1614.18,2795.28) 1614.18,2732.28 1772.84,2573.62 3314.43,2573.62 3566.79,2321.26 3832.19,2321.26 4046.76,2535.83 5205.53,2535.83 5387.64,2717.93 5387.64,2757.72 5448.82,2818.9 v1(5488.19,2818.9)
EXT_A.D13: EXTHDR1.28 HDR_L1.27 | length 4510.7
  Top Layer w7.87: v1(1582.68,2771.65) EXTHDR1.28@1582.68,2874.02 ; v1(5464.57,2787.4) HDR_L1.27@5566.93,2787.4
  MidLayer1 w5: v1(1582.68,2771.65) 1582.68,2732.28 1751.34,2563.62 3310.29,2563.62 3562.65,2311.26 3836.33,2311.26 4050.9,2525.83 5209.67,2525.83 5397.64,2713.79 5397.64,2736.22 5448.82,2787.4 v1(5464.57,2787.4)
EXT_A.D14: EXTHDR1.30 HDR_L1.29 | length 4524.3
  Top Layer w7.87: v1(1551.18,2795.28) EXTHDR1.30@1551.18,2874.02 ; v1(5488.19,2755.91) HDR_L1.29@5566.93,2755.91
  MidLayer1 w5: v1(1551.18,2795.28) 1551.18,2732.28 1729.84,2553.62 3306.15,2553.62 3558.51,2301.26 3840.47,2301.26 4055.04,2515.83 5213.82,2515.83 5453.9,2755.91 v1(5488.19,2755.91)
EXT_A.D15: EXTHDR1.32 HDR_L1.31 | length 4551.1
  Top Layer w7.87: v1(1519.69,2771.65) EXTHDR1.32@1519.69,2874.02 ; v1(5464.57,2724.41) HDR_L1.31@5566.93,2724.41
  MidLayer1 w5: v1(1519.69,2771.65) 1519.69,2732.28 1708.35,2543.62 3302.01,2543.62 3554.37,2291.26 3844.62,2291.26 4059.18,2505.83 5217.96,2505.83 5436.54,2724.41 v1(5464.57,2724.41)
EXT_A.D16: EXTHDR1.34 HDR_L1.33 | length 4577.8
  Top Layer w7.87: v1(1488.19,2795.28) EXTHDR1.34@1488.19,2874.02 ; v1(5488.19,2692.91) HDR_L1.33@5566.93,2692.91
  MidLayer1 w5: v1(1488.19,2795.28) 1488.19,2732.28 1686.85,2533.62 3297.86,2533.62 3550.23,2281.26 3848.76,2281.26 4063.33,2495.83 5222.1,2495.83 5419.19,2692.91 v1(5488.19,2692.91)
EXT_A.D17: EXTHDR1.36 HDR_L1.35 | length 4604.5
  Top Layer w7.87: v1(1456.7,2771.65) EXTHDR1.36@1456.69,2874.02 ; v1(5464.57,2661.42) HDR_L1.35@5566.93,2661.42
  MidLayer1 w5: v1(1456.7,2771.65) 1456.7,2732.28 1665.36,2523.62 3293.72,2523.62 3546.08,2271.26 3852.9,2271.26 4067.47,2485.83 5226.24,2485.83 5401.84,2661.42 v1(5464.57,2661.42)
EXT_A.D18: EXTHDR1.38 HDR_L1.37 | length 4631.3
  Top Layer w7.87: v1(1425.2,2795.28) EXTHDR1.38@1425.2,2874.02 ; v1(5488.19,2629.92) HDR_L1.37@5566.93,2629.92
  MidLayer1 w5: v1(1425.2,2795.28) 1425.2,2732.28 1643.86,2513.62 3289.58,2513.62 3541.94,2261.26 3857.04,2261.26 4071.61,2475.83 5230.39,2475.83 5384.48,2629.92 v1(5488.19,2629.92)
EXT_A.D19: EXTHDR1.40 HDR_L1.39 | length 4658
  Top Layer w7.87: v1(1393.7,2771.65) EXTHDR1.40@1393.7,2874.02 ; v1(5464.57,2598.43) HDR_L1.39@5566.93,2598.43
  MidLayer1 w5: v1(1393.7,2771.65) 1393.7,2732.28 1623.23,2502.76 3283.77,2502.76 3535.26,2251.26 3861.19,2251.26 4075.75,2465.83 5234.53,2465.83 5367.13,2598.43 v1(5464.57,2598.43)
EXT_A.D20: EXTHDR1.42 HDR_L1.41 | length 4684.7
  Top Layer w7.87: v1(1362.21,2795.28) EXTHDR1.42@1362.2,2874.02 ; v1(5488.19,2566.93) HDR_L1.41@5566.93,2566.93
  MidLayer1 w5: v1(1362.21,2795.28) 1362.21,2732.28 1601.73,2492.76 3279.62,2492.76 3531.12,2241.26 3865.33,2241.26 4079.89,2455.83 5238.67,2455.83 5349.77,2566.93 v1(5488.19,2566.93)
EXT_A.D21: EXTHDR1.44 HDR_L1.43 | length 4711.5
  Top Layer w7.87: v1(1330.71,2771.65) EXTHDR1.44@1330.71,2874.02 ; v1(5464.57,2535.43) HDR_L1.43@5566.93,2535.43
  MidLayer1 w5: v1(1330.71,2771.65) 1330.71,2732.28 1580.24,2482.76 3275.48,2482.76 3526.98,2231.26 3869.47,2231.26 4084.04,2445.83 5242.81,2445.83 5332.42,2535.43 v1(5464.57,2535.43)
EXT_A.D22: EXTHDR1.46 HDR_L1.45 | length 4738.2
  Top Layer w7.87: v1(1299.21,2795.28) EXTHDR1.46@1299.21,2874.02 ; v1(5488.19,2503.94) HDR_L1.45@5566.93,2503.94
  MidLayer1 w5: v1(1299.21,2795.28) 1299.21,2732.28 1558.74,2472.76 3271.34,2472.76 3522.83,2221.26 3873.61,2221.26 4088.18,2435.83 5246.95,2435.83 5315.06,2503.94 v1(5488.19,2503.94)
EXT_A.D23: EXTHDR1.48 HDR_L1.47 | length 4764.9
  Top Layer w7.87: v1(1267.72,2771.65) EXTHDR1.48@1267.72,2874.02 ; v1(5464.57,2472.44) HDR_L1.47@5566.93,2472.44
  MidLayer1 w5: v1(1267.72,2771.65) 1267.72,2732.28 1537.24,2462.76 3267.2,2462.76 3518.69,2211.26 3877.75,2211.26 4092.32,2425.83 5251.1,2425.83 5297.71,2472.44 v1(5464.57,2472.44)
EXT_A.D24: EXTHDR1.50 HDR_L1.49 | length 4791.7
  Top Layer w7.87: v1(1236.22,2795.28) EXTHDR1.50@1236.22,2874.02 ; v1(5488.19,2440.95) HDR_L1.49@5566.93,2440.95
  MidLayer1 w5: v1(1236.22,2795.28) 1236.22,2732.28 1515.75,2452.76 3263.05,2452.76 3514.55,2201.26 3881.9,2201.26 4096.46,2415.83 5255.24,2415.83 5280.36,2440.95 v1(5488.19,2440.95)
EXT_A.D25: EXTHDR1.52 HDR_L1.51 | length 5134.6
  Top Layer w7.87: v1(1204.73,2771.65) EXTHDR1.52@1204.72,2874.02 ; v1(5464.57,2409.45) HDR_L1.51@5566.93,2409.45
  MidLayer1 w5: v1(1204.73,2771.65) 1204.73,2732.28 1088.43,2615.98 1088.43,2473.69 1121.32,2440.79 3260.88,2440.79 3510.72,2190.95 3886.17,2190.95 4100.74,2405.51 5437.01,2405.51 5440.95,2409.45 v1(5464.57,2409.45)
EXT_A.D26: EXTHDR1.54 HDR_L1.53 | length 5147.9
  Top Layer w7.87: v1(1173.23,2795.28) EXTHDR1.54@1173.23,2874.02 ; v1(5488.19,2377.95) HDR_L1.53@5566.93,2377.95
  MidLayer1 w5: v1(1173.23,2795.28) 1173.23,2732.28 1078.43,2637.48 1078.43,2469.54 1117.18,2430.79 3256.74,2430.79 3506.58,2180.95 3890.31,2180.95 4104.88,2395.51 5254.09,2395.51 5271.65,2377.95 v1(5488.19,2377.95)
EXT_A.D27: EXTHDR1.56 HDR_L1.55 | length 5164.5
  Top Layer w7.87: v1(1141.73,2771.65) EXTHDR1.56@1141.73,2874.02 ; v1(5464.57,2346.46) HDR_L1.55@5566.93,2346.46
  MidLayer1 w5: v1(1141.73,2771.65) 1141.73,2732.28 1068.43,2658.98 1068.43,2465.4 1113.04,2420.79 3252.6,2420.79 3502.44,2170.95 3894.45,2170.95 4109.02,2385.51 5249.95,2385.51 5289.01,2346.46 v1(5464.57,2346.46)
EXT_A.D28: EXTHDR1.58 HDR_L1.57 | length 5181.1
  Top Layer w7.87: v1(1110.24,2795.28) EXTHDR1.58@1110.24,2874.02 ; v1(5488.19,2314.96) HDR_L1.57@5566.93,2314.96
  MidLayer1 w5: v1(1110.24,2795.28) 1110.24,2732.28 1058.43,2680.47 1058.43,2461.26 1108.9,2410.79 3248.45,2410.79 3498.3,2160.95 3898.59,2160.95 4113.16,2375.51 5245.81,2375.51 5306.36,2314.96 v1(5488.19,2314.96)
EXT_A.D29: EXTHDR1.60 HDR_L1.59 | length 5197.6
  Top Layer w7.87: v1(1078.74,2771.65) EXTHDR1.60@1078.74,2874.02 ; v1(5464.57,2283.47) HDR_L1.59@5566.93,2283.47
  MidLayer1 w5: v1(1078.74,2771.65) 1078.74,2732.28 1048.43,2701.97 1048.43,2457.12 1104.76,2400.79 3244.31,2400.79 3494.15,2150.95 3902.74,2150.95 4117.3,2365.51 5241.67,2365.51 5323.72,2283.47 v1(5464.57,2283.47)
EXT_A.D30: EXTHDR1.62 HDR_L1.61 | length 5214.2
  Top Layer w7.09: v1(1047.25,2795.28) EXTHDR1.62@1047.24,2874.02 ; v1(5488.19,2251.97) HDR_L1.61@5566.93,2251.97
  MidLayer1 w5: v1(1047.25,2795.28) 1047.25,2732.28 1038.43,2723.46 1038.43,2452.98 1100.61,2390.79 3240.17,2390.79 3490.01,2140.95 3906.88,2140.95 4121.45,2355.51 5237.53,2355.51 5341.07,2251.97 v1(5488.19,2251.97)
EXT_A.D31: EXTHDR1.64 HDR_L1.63 | length 5241.3
  Top Layer w7.09: v1(1015.75,2771.65) EXTHDR1.64@1015.75,2874.02 ; v1(5464.57,2220.47) HDR_L1.63@5566.93,2220.47
  MidLayer1 w5: v1(1015.75,2771.65) 1015.75,2461.51 1096.47,2380.79 3236.03,2380.79 3485.87,2130.95 3911.02,2130.95 4125.59,2345.51 5233.38,2345.51 5358.42,2220.47 v1(5464.57,2220.47)
EXT_A.D32: EXTHDR1.66 HDR_L1.65 | length 5276.6
  Top Layer w7.09: v1(984.25,2795.28) EXTHDR1.66@984.25,2874.02 ; v1(5488.19,2188.98) HDR_L1.65@5566.93,2188.98
  MidLayer1 w5: v1(984.25,2795.28) 984.25,2477.26 1090.72,2370.79 3231.89,2370.79 3481.73,2120.95 3915.16,2120.95 4129.73,2335.51 5229.24,2335.51 5375.78,2188.98 v1(5488.19,2188.98)
EXT_A.D33: EXTHDR1.68 HDR_L1.67 | length 5311
  Top Layer w7.09: v1(952.76,2771.65) EXTHDR1.68@952.76,2874.02 ; v1(5464.57,2157.48) HDR_L1.67@5566.93,2157.48
  MidLayer1 w5: v1(952.76,2771.65) 952.76,2494.61 1086.58,2360.79 3227.74,2360.79 3477.59,2110.95 3919.31,2110.95 4133.87,2325.51 5225.1,2325.51 5393.13,2157.48 v1(5464.57,2157.48)
EXT_A.D34: EXTHDR1.70 HDR_L1.69 | length 5345.4
  Top Layer w7.09: v1(921.26,2795.28) EXTHDR1.70@921.26,2874.02 ; v1(5488.19,2125.99) HDR_L1.69@5566.93,2125.98
  MidLayer1 w5: v1(921.26,2795.28) 921.26,2511.97 1082.44,2350.79 3223.6,2350.79 3473.44,2100.95 3923.45,2100.95 4138.01,2315.51 5220.96,2315.51 5410.48,2125.99 v1(5488.19,2125.99)
EXT_A.D35: EXTHDR1.72 HDR_L1.71 | length 5379.7
  Top Layer w7.09: v1(889.77,2771.65) EXTHDR1.72@889.76,2874.02 ; v1(5464.57,2094.49) HDR_L1.71@5566.93,2094.49
  MidLayer1 w5: v1(889.77,2771.65) 889.76,2529.32 1078.3,2340.79 3219.46,2340.79 3469.3,2090.95 3927.59,2090.95 4142.16,2305.51 5216.82,2305.51 5427.84,2094.49 v1(5464.57,2094.49)
EXT_A.D36: EXTHDR1.74 HDR_L1.73 | length 5414.1
  Top Layer w7.09: v1(858.27,2795.28) EXTHDR1.74@858.27,2874.02 ; v1(5488.19,2062.99) HDR_L1.73@5566.93,2062.99
  MidLayer1 w5: v1(858.27,2795.28) 858.27,2546.67 1074.16,2330.79 3215.32,2330.79 3465.16,2080.95 3931.73,2080.95 4146.3,2295.51 5212.67,2295.51 5445.19,2062.99 v1(5488.19,2062.99)
EXT_A.D37: EXTHDR1.76 HDR_L1.75 | length 5461.6
  Top Layer w7.09: v1(826.77,2771.65) EXTHDR1.76@826.77,2874.02 ; v1(5464.57,2031.5) HDR_L1.75@5566.93,2031.5
  MidLayer1 w5: v1(826.77,2771.65) 826.77,2564.03 1070.01,2320.79 3211.18,2320.79 3461.02,2070.95 3935.87,2070.95 4150.44,2285.51 5208.53,2285.51 5396.49,2097.55 5396.49,2075.12 5440.12,2031.5 v1(5464.57,2031.5)
EXT_A.D38: EXTHDR1.78 HDR_L1.77 | length 5506.2
  Top Layer w7.09: v1(795.28,2795.28) EXTHDR1.78@795.28,2874.02 ; v1(5488.19,2000) HDR_L1.77@5566.93,2000
  MidLayer1 w5: v1(795.28,2795.28) 795.28,2581.38 1065.87,2310.79 3207.03,2310.79 3456.88,2060.95 3940.02,2060.95 4154.58,2275.51 5204.39,2275.51 5386.49,2093.41 5386.49,2053.62 5440.12,2000 v1(5488.19,2000)
EXT_A.D39: EXTHDR1.80 HDR_L1.79 | length 5550.7
  Top Layer w7.09: v1(763.78,2771.65) EXTHDR1.80@763.78,2874.02 ; v1(5464.57,1968.51) HDR_L1.79@5566.93,1968.5
  MidLayer1 w5: v1(763.78,2771.65) 763.78,2598.74 1061.73,2300.79 3202.89,2300.79 3452.73,2050.95 3944.16,2050.95 4158.73,2265.51 5200.25,2265.51 5376.49,2089.27 5376.49,2032.13 5440.12,1968.51 v1(5464.57,1968.51)
EXT_A.D40: EXTHDR1.82 HDR_L1.81 | length 5595.2
  Top Layer w7.09: v1(732.28,2795.28) EXTHDR1.82@732.28,2874.02 ; v1(5488.19,1937.01) HDR_L1.81@5566.93,1937.01
  MidLayer1 w5: v1(732.28,2795.28) 732.28,2616.09 1057.59,2290.79 3198.75,2290.79 3448.59,2040.95 3948.3,2040.95 4162.87,2255.51 5196.1,2255.51 5366.49,2085.12 5366.49,2010.63 5440.12,1937.01 v1(5488.19,1937.01)
EXT_A.D41: EXTHDR1.84 HDR_L1.83 | length 5639.8
  Top Layer w7.09: v1(700.79,2771.65) EXTHDR1.84@700.79,2874.02 ; v1(5464.57,1905.51) HDR_L1.83@5566.93,1905.51
  MidLayer1 w5: v1(700.79,2771.65) 716.54,2755.91 716.54,2617.7 1053.44,2280.79 3194.61,2280.79 3444.45,2030.95 3952.44,2030.95 4167.01,2245.51 5191.96,2245.51 5356.49,2080.98 5356.49,1989.13 5440.12,1905.51 v1(5464.57,1905.51)
EXT_A.D42: EXTHDR1.86 HDR_L1.85 | length 5684.3
  Top Layer w7.09: EXTHDR1.86@669.29,2874.02 669.29,2744.1 v1(688.98,2724.41) ; v1(5488.19,1874.02) HDR_L1.85@5566.93,1874.02
  MidLayer1 w5: v1(688.98,2724.41) 688.98,2631.11 1049.3,2270.79 3190.46,2270.79 3440.31,2020.95 3956.58,2020.95 4171.15,2235.51 5187.82,2235.51 5346.49,2076.84 5346.49,1967.64 5440.12,1874.02 v1(5488.19,1874.02)
EXT_A.D43: EXTHDR1.88 HDR_L1.87 | length 5734
  Top Layer w7.09: v1@625.98,2732.28 637.79,2744.09 EXTHDR1.88@637.79,2874.02 ; v1(5464.57,1842.52) HDR_L1.87@5566.93,1842.52
  MidLayer1 w5: v1(618.11,2724.41) 618.11,2687.84 1045.16,2260.79 3186.32,2260.79 3436.17,2010.95 3960.73,2010.95 4175.29,2225.51 5183.68,2225.51 5336.49,2072.7 5336.49,1946.14 5440.12,1842.52 v1(5464.57,1842.52)
EXT_A.D44: EXTHDR1.90 HDR_L1.89 | length 5786.5
  Top Layer w7.87: v1(606.3,2795.28) EXTHDR1.90@606.3,2874.02 ; v1(5488.19,1811.02) HDR_L1.89@5566.93,1811.02
  MidLayer1 w5: v1(606.3,2795.28) 606.3,2763.78 590.55,2748.03 590.55,2701.25 1041.02,2250.79 3182.18,2250.79 3432.02,2000.95 3964.87,2000.95 4179.44,2215.51 5179.54,2215.51 5326.49,2068.55 5326.49,1924.64 5440.12,1811.02 v1(5488.19,1811.02)
EXT_A.D45: EXTHDR1.92 HDR_L1.91 | length 5818
  Top Layer w7.87: v1(574.8,2771.65) EXTHDR1.92@574.8,2874.02 ; v1(5464.57,1779.53) HDR_L1.91@5566.93,1779.53
  MidLayer1 w5: v1(574.8,2771.65) 574.8,2702.86 1036.88,2240.79 3178.04,2240.79 3427.88,1990.95 3969.01,1990.95 4183.58,2205.51 5175.39,2205.51 5316.49,2064.41 5316.49,1903.15 5440.12,1779.53 v1(5464.57,1779.53)
EXT_A.D46: EXTHDR1.94 HDR_L1.93 | length 5862.5
  Top Layer w7.87: v1(543.31,2795.28) EXTHDR1.94@543.31,2874.02 ; v1(5488.19,1748.03) HDR_L1.93@5566.93,1748.03
  MidLayer1 w5: v1(543.31,2795.28) 543.31,2720.22 1032.73,2230.79 3173.9,2230.79 3423.74,1980.95 3973.15,1980.95 4187.72,2195.51 5171.25,2195.51 5306.49,2060.27 5306.49,1881.65 5440.12,1748.03 v1(5488.19,1748.03)
EXT_A.D47: EXTHDR1.96 HDR_L1.95 | length 5907
  Top Layer w7.87: v1(511.81,2771.65) EXTHDR1.96@511.81,2874.02 ; v1(5464.57,1716.54) HDR_L1.95@5566.93,1716.54
  MidLayer1 w5: v1(511.81,2771.65) 511.81,2737.57 1028.59,2220.79 3169.75,2220.79 3419.6,1970.95 3977.3,1970.95 4191.86,2185.51 5167.11,2185.51 5296.49,2056.13 5296.49,1860.16 5440.12,1716.54 v1(5464.57,1716.54)
EXT_A.D48: EXTHDR1.98 HDR_L1.97 | length 5951.6
  Top Layer w7.87: v1(480.32,2795.28) EXTHDR1.98@480.31,2874.02 ; v1(5488.19,1685.04) HDR_L1.97@5566.93,1685.04
  MidLayer1 w5: v1(480.32,2795.28) 480.31,2754.92 1024.45,2210.79 3165.61,2210.79 3415.45,1960.95 3981.44,1960.95 4196,2175.51 5162.97,2175.51 5286.49,2051.99 5286.49,1838.66 5440.12,1685.04 v1(5488.19,1685.04)
EXT_A.D49: EXTHDR1.100 HDR_L1.99 | length 5997.4
  Top Layer w7.87: v1(448.82,2771.65) EXTHDR1.100@448.82,2874.02 ; v1(5464.57,1653.54) HDR_L1.99@5566.93,1653.54
  MidLayer1 w5: v1(448.82,2771.65) 448.82,2772.28 449.13,2771.97 1020.31,2200.79 3161.47,2200.79 3411.31,1950.95 3985.58,1950.95 4200.15,2165.51 5158.83,2165.51 5276.49,2047.84 5276.49,1817.17 5440.12,1653.54 v1(5464.57,1653.54)